# Altium PCB VCA.PcbDoc
Units mil, origin at the board's own origin, x right, y up, seen from the top; angles counter-clockwise.
Board outline 1102.36 x 3937.01 mil, 2 copper layers (Top Layer, Bottom Layer); 75 components, 53 nets, 251 pads, 58 vias.
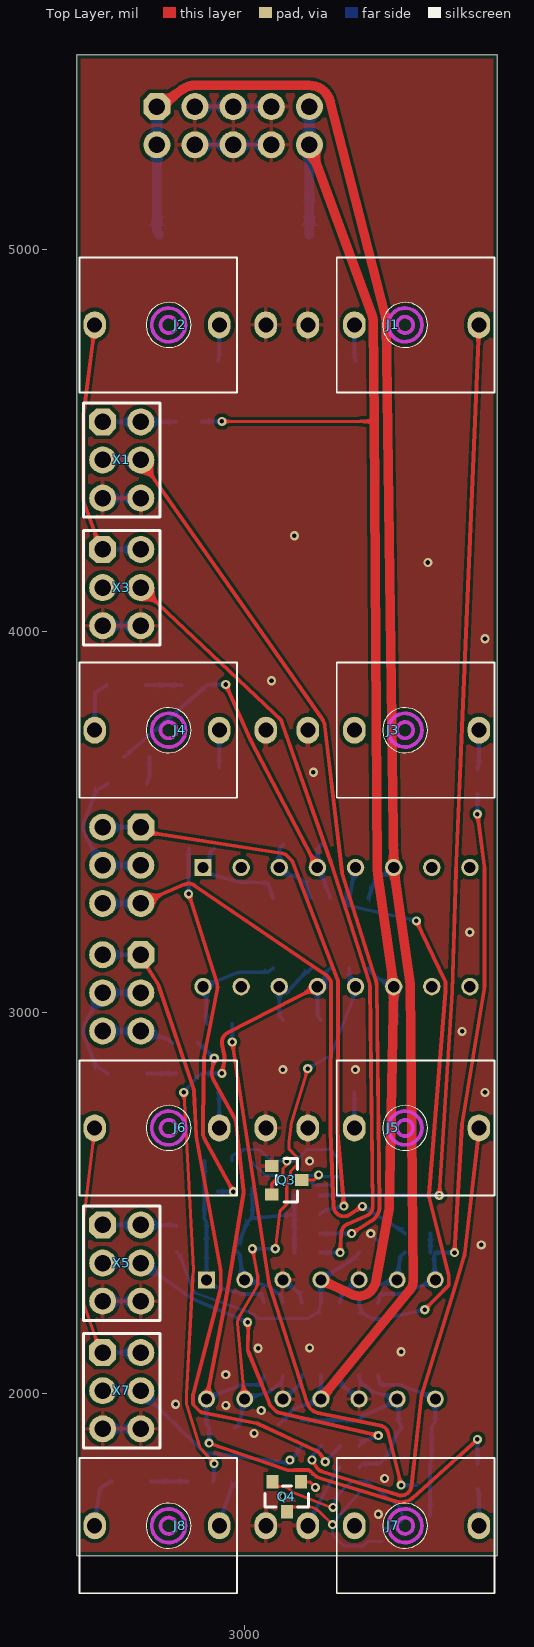
[diagram p0: Top Layer view]
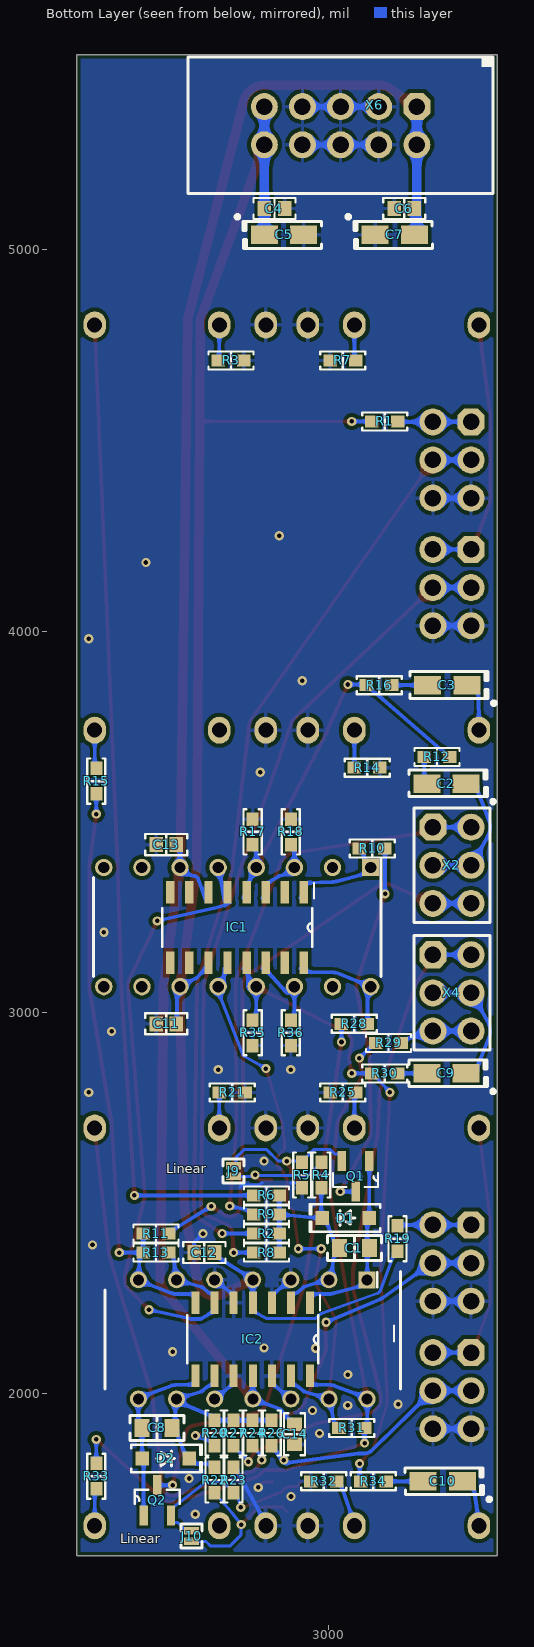
[diagram p1: Bottom Layer view, seen from below]
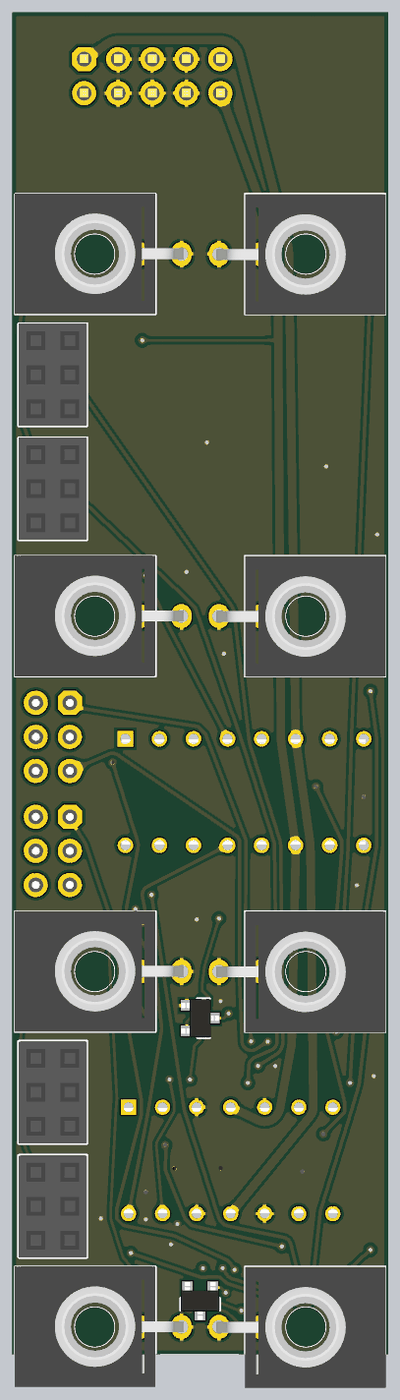
[diagram p2: 3D render of the assembled board from above, using the file's embedded part models]
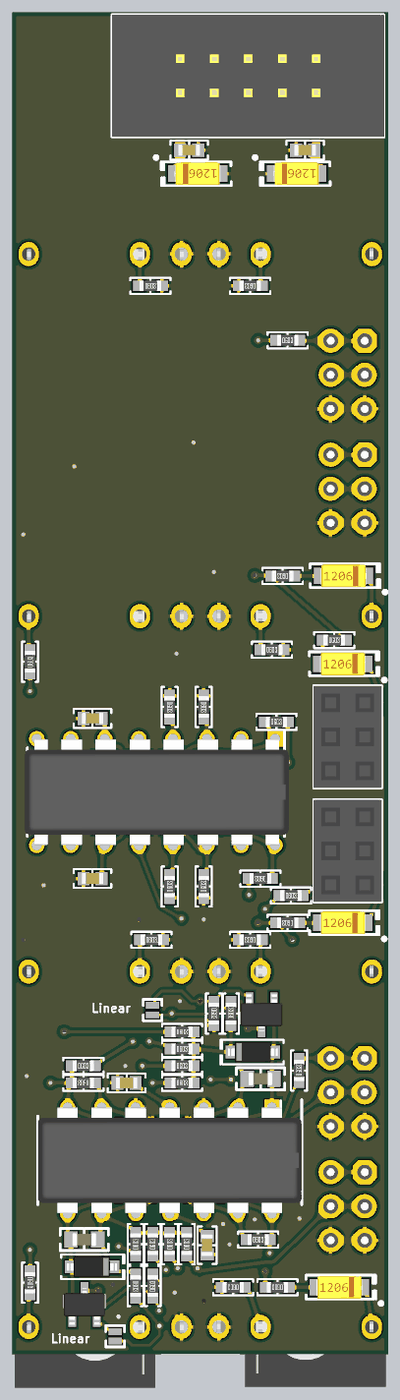
[diagram p3: 3D render of the assembled board from below, using the file's embedded part models]

## Layer stack, top to bottom
Top Solder: solder mask 0.4, Solder Resist, Dk 3.5
Top Layer: signal copper 1.4
Dielectric 1: dielectric 12.6, FR-4, Dk 4.8
Bottom Layer: signal copper 1.4
Bottom Solder: solder mask 0.4, Solder Resist, Dk 3.5

## Board outline
2559.06,1574.8 3661.42,1574.8 3661.42,5511.81 2559.06,5511.81

## Design rules (kind name [scope] priority, off if disabled: settings)
BoardOutlineClearance [All] p1: gap=10 ignorepadtopadclearanceinfootprint=FALSE except(0: Arc-SplitContinuation Track-SplitContinuation SMDPad-SplitContinuation THPad-SplitContinuation Via-SplitContinuation Fill-SplitContinuation Poly-SplitContinuation Region-SplitContinuation Text-SplitContinuation)
Clearance [All] p1: gap=10 ignorepadtopadclearanceinfootprint=FALSE except(8: Arc-Arc Arc-Track Arc-SMDPad Arc-Fill Arc-Poly Arc-Region Track-Track Track-SMDPad Track-Fill Track-Poly Track-Region SMDPad-SMDPad SMDPad-Fill SMDPad-Poly SMDPad-Region)
PolygonConnect [All] p1: thpad.connectstyle=Relief thpad.reliefconductorwidth=10 thpad.reliefentries=4 thpad.polygonreliefangle="90 Angle" thpad.airgapwidth=10 smdpad.connectstyle=Relief smdpad.reliefconductorwidth=10 smdpad.reliefentries=4 smdpad.polygonreliefangle="90 Angle" smdpad.airgapwidth=10 via.connectstyle=Direct via.reliefconductorwidth=10 via.reliefentries=4 via.polygonreliefangle="90 Angle" via.airgapwidth=10
RoutingVias [All] p1: holewidth=12 width=24 viastyle="Through Hole" minholewidth=12 minwidth=24 maxholewidth=12 maxwidth=24
SolderMaskExpansion [All] p1: expansion=4 istentingtop=FALSE
Width [All] p1: maxlimit=25 minlimit=8 preferedwidth=8
30 further rules are at their usual default settings.

## Components (designator, comment, footprint, x,y, rotation, side; value= is the part's Value field where it differs from the comment)
C1 "10000 pF" "MURATA GRM188 0603_1608" 2933.07,2381.89 r0 bottom
C2 "10µF" "CAP POL 1206_3216" 2691.57,3600 r0 bottom
C3 "10µF" "CAP POL 1206_3216" 2689.37,3858.27 r0 bottom
C4 "0.1 µF" "CAP 0603_1608" 3142.72,5108.27 r0 bottom
C5 "10µF" "CAP POL 1206_3216" 3117.72,5039.37 r180 bottom
C6 "0.1 µF" "CAP 0603_1608" 2802.17,5108.27 r0 bottom
C7 "10µF" "CAP POL 1206_3216" 2827.17,5039.37 r180 bottom
C8 "10000 pF" "MURATA GRM188 0603_1608" 3450.63,1910 r180 bottom
C9 "10µF" "CAP POL 1206_3216" 2691.57,2840 r0 bottom
C10 "10µF" "CAP POL 1206_3216" 2701.57,1770 r0 bottom
C11 "0.1 µF" "CAP 0603_1608" 3426.57,2970 r180 bottom
C12 "0.1 µF" "CAP 0603_1608" 3326.57,2370 r180 bottom
C13 "0.1 µF" "CAP 0603_1608" 3426.57,3440 r0 bottom
C14 "0.1 µF" "CAP 0603_1608" 3090,1893.43 r270 bottom
D1 "1N4148W-TP" SOD-123 2955.71,2460.63 r0 bottom
D2 "1N4148W-TP" SOD-123 3427.99,1830 r180 bottom
IC1 "LM13700N_NOPB" DIP_SMD-16 3240.42,3223.79 r270 bottom
IC2 "TL074CN" DIP_SMD-14 3199.61,2142.35 r270 bottom
J1 "ENV_IN" THONKICONN 3165.35,4803.15 r270 top
J2 "CV_IN" THONKICONN 3055.12,4803.15 r90 top
J3 "OUT1" THONKICONN 3165.35,3740.16 r270 top
J4 "IN1" THONKICONN 3055.12,3740.16 r90 top
J5 "ENV_IN" THONKICONN 3165.35,2696.85 r270 top
J6 "CV_IN" THONKICONN 3055.12,2696.85 r90 top
J7 "OUT2" THONKICONN 3165.35,1653.54 r270 top
J8 "IN2" THONKICONN 3055.12,1653.54 r90 top
J9 "Linear" "CON: JUMPER x1" 3250,2570 r90 bottom
J10 "Linear" "CON: JUMPER x1" 3360,1612.44 r90 bottom
Q1 "3906" SOT-23 2930,2570 r270 bottom
Q2 "3906" SOT-23 3450,1720 r90 bottom
Q3 "MMBT3904-7-F" "DIODES SOT-23-3" 3110,2560 r0 top
Q4 "MMBT3904-7-F" "DIODES SOT-23-3" 3110,1730 r270 top
R1 "120 kOhms" "YAGEO RES 0603_1608" 2853.46,4550 r180 bottom
R2 "330 kOhms" "YAGEO RES 0603_1608" 3163.46,2420 r180 bottom
R3 "100 kOhms" "YAGEO RES 0603_1608" 3256.54,4710 r180 bottom
R4 "33 kOhms" "YAGEO RES 0603_1608" 3020,2573.47 r90 bottom
R5 "1 kOhms" "YAGEO RES 0603_1608" 3070,2573.46 r270 bottom
R6 "330 kOhms" "YAGEO RES 0603_1608" 3163.46,2520 r180 bottom
R7 "100 kOhms" "YAGEO RES 0603_1608" 2963.46,4710 r0 bottom
R8 "330 kOhms" "YAGEO RES 0603_1608" 3163.46,2370 r180 bottom
R9 "330 kOhms" "YAGEO RES 0603_1608" 3163.46,2470 r180 bottom
R10 "6.8 kOhms" "YAGEO RES 0603_1608" 2886.54,3430 r180 bottom
R11 "1 kOhms" "YAGEO RES 0603_1608" 3453.46,2420 r180 bottom
R12 "100 kOhms" "YAGEO RES 0603_1608" 2716.54,3670 r180 bottom
R13 "18 kOhms" "YAGEO RES 0603_1608" 3453.46,2370 r0 bottom
R14 "100 kOhms" "YAGEO RES 0603_1608" 2899.61,3641.73 r180 bottom
R15 "1 kOhms" "YAGEO RES 0603_1608" 3610,3606.54 r90 bottom
R16 "100 kOhms" "YAGEO RES 0603_1608" 2868.11,3858.27 r0 bottom
R17 "620 Ohms" "YAGEO RES 0603_1608" 3200,3473.46 r270 bottom
R18 "620 Ohms" "YAGEO RES 0603_1608" 3100,3473.46 r270 bottom
R19 "120 kOhms" "YAGEO RES 0603_1608" 2820,2406.54 r90 bottom
R20 "330 kOhms" "YAGEO RES 0603_1608" 3300,1896.54 r90 bottom
R21 "100 kOhms" "YAGEO RES 0603_1608" 3253.46,2790 r180 bottom
R22 "33 kOhms" "YAGEO RES 0603_1608" 3300,1773.46 r270 bottom
R23 "1 kOhms" "YAGEO RES 0603_1608" 3250,1773.46 r90 bottom
R24 "330 kOhms" "YAGEO RES 0603_1608" 3200,1896.54 r90 bottom
R25 "100 kOhms" "YAGEO RES 0603_1608" 2963.46,2790 r0 bottom
R26 "330 kOhms" "YAGEO RES 0603_1608" 3150,1896.54 r90 bottom
R27 "330 kOhms" "YAGEO RES 0603_1608" 3250,1896.54 r90 bottom
R28 "6.8 kOhms" "YAGEO RES 0603_1608" 2933.46,2970 r0 bottom
R29 "1 kOhms" "YAGEO RES 0603_1608" 2843.46,2920 r180 bottom
R30 "100 kOhms" "YAGEO RES 0603_1608" 2853.46,2840 r0 bottom
R31 "18 kOhms" "YAGEO RES 0603_1608" 2940,1910 r180 bottom
R32 "100 kOhms" "YAGEO RES 0603_1608" 3013.46,1770 r0 bottom
R33 "1 kOhms" "YAGEO RES 0603_1608" 3610,1783.46 r270 bottom
R34 "100 kOhms" "YAGEO RES 0603_1608" 2883.46,1770 r0 bottom
R35 "620 Ohms" "YAGEO RES 0603_1608" 3200,2946.54 r90 bottom
R36 "620 Ohms" "YAGEO RES 0603_1608" 3100,2946.54 r90 bottom
X1 "Connector, 6pin, 2.54mm, 500VAC, 3A" "CON: PBD-6" 2677.17,4448.82 r270 top
X2 "Connector, 6pin, 2.54mm, 500VAC, 3A" "CON: PBD-6" 2677.17,3385.83 r270 bottom
X3 "Connector, 6pin, 2.54mm, 500VAC, 3A" "CON: PBD-6" 2677.17,4114.17 r270 top
X4 "Connector, 6pin, 2.54mm, 500VAC, 3A" "CON: PBD-6" 2677.17,3051.18 r270 bottom
X5 "Connector, 6pin, 2.54mm, 500VAC, 3A" "CON: PBD-6" 2677.17,2342.52 r270 top
X6 "Connector, 10pin, 2.54mm, 250VAC, 3A" "CON: IDC-10MS" 2969.29,5325.59 r0 bottom
X7 "Connector, 6pin, 2.54mm, 500VAC, 3A" "CON: PBD-6" 2677.17,2007.87 r270 top

## Footprints (in the part's own frame and the unit in brackets; to place one, negate y for a bottom-side part, rotate by r counter-clockwise, add the part's x,y. Pads: shape width x height; smd on the part's side, far side on the other; paste and mask are expansions set on the pad)
"CAP 0603_1608" [mm] "Chip Capacitor, 2-Leads, Body 1.60x0.80mm, IPC Medium Density"
  rect 0.9x1 smd: 1(-0.675,0) 2(0.675,0)
  silkscreen extent -1.4,-0.7 1.4,0.7, body extent -0.8,-0.41 0.8,0.41, height 0.82
"CAP POL 1206_3216" [mm] "Molded Capacitor, 2-Leads, Body 3.20x1.6mm, IPC Medium Density"
  rect 1.8x1.23 smd: 1(-1.31,0) 2(1.31,0)
  silkscreen extent -3.22,-0.9 2.5,1.32, body extent -1.72,-0.85 1.71,0.85, height 1.7
"CON: IDC-10MS" [mm] "IDC-10MS 10 pin PCB-mount header"
  oct 1.8x1.8 hole 1.1: 1(-5.08,-1.27)
  round 1.8 hole 1.1: 2(-5.08,1.27) 3(-2.54,-1.27) 4(-2.54,1.27) 5(0,-1.27) 6(0,1.27) 7(2.54,-1.27) 8(2.54,1.27) 9(5.08,-1.27) 10(5.08,1.27)
  round 0.5 on Mech1: ""(-9.6,-4)
  silkscreen extent -10.14,-4.57 10.16,4.53, body extent -10.14,-4.57 10.16,4.53, height 9
"CON: JUMPER x1" [mm]
  rect 0.5x1 smd: 1(0,0) 2(0.7,0)
  silkscreen extent -0.45,-0.7 1.15,0.7
"CON: PBD-6" [mm] "PBD-6"
  oct 1.8x1.8 hole 1.1: 1(-2.54,-1.27)
  round 1.8 hole 1.1: 2(-2.54,1.27) 3(0,-1.27) 4(0,1.27) 5(2.54,-1.27) 6(2.54,1.27)
  silkscreen extent -3.81,-2.54 3.81,2.54, body extent -3.81,-2.54 3.81,2.54, height 8.5
"DIODES SOT-23-3" [mm] "SOT23, 3-Leads, Body 2.90x2.40mm, Pitch 0.95mm, IPC Medium Density"
  rect 0.9x0.8 smd: 1(-1,0.95) 2(-1,-0.95) 3(1,0)
  silkscreen extent -0.7,-1.45 0.7,1.45, body extent -1.41,-1.45 1.41,1.45, height 1.5
DIP_SMD-14 [mm] "Combo footprint for opamps that i have"
  rect 1.13x1.13 hole 0.73: 1(-3.97,7.62)
  rect 1.5x0.533 smd: 1(-2.441,3.81) 2(-2.441,2.54) 3(-2.441,1.27) 4(-2.441,0) 5(-2.441,-1.27) 6(-2.441,-2.54) 7(-2.441,-3.81) 8(2.416,-3.81) 9(2.416,-2.54) 10(2.416,-1.27) 11(2.416,0) 12(2.416,1.27) 13(2.416,2.54) 14(2.416,3.81)
  round 1.13 hole 0.73: 2(-3.97,5.08) 3(-3.97,2.54) 4(-3.97,0) 5(-3.97,-2.54) 6(-3.97,-5.08) 7(-3.97,-7.62) 8(3.97,-7.62) 9(3.97,-5.08) 10(3.97,-2.54) 11(3.97,0) 12(3.97,2.54) 13(3.97,5.08) 14(3.97,7.62)
  silkscreen extent -4.53,-9.84 3.3,9.84, body extent -3.94,-9.84 3.94,9.84, height 5.27
DIP_SMD-16 [mm] "Combo footprint for opamps that i have"
  rect 1.159x1.159 hole 0.759: 1(-3.969,8.89)
  rect 1.5x0.559 smd: 1(-2.325,4.435) 2(-2.325,3.165) 3(-2.325,1.895) 4(-2.325,0.625) 5(-2.325,-0.645) 6(-2.325,-1.915) 7(-2.325,-3.185) 8(-2.325,-4.455) 9(2.375,-4.455) 10(2.375,-3.185) 11(2.375,-1.915) 12(2.375,-0.645) 13(2.375,0.625) 14(2.375,1.895) 15(2.375,3.165) 16(2.375,4.435)
  round 1.159 hole 0.759: 2(-3.969,6.35) 3(-3.969,3.81) 4(-3.969,1.27) 5(-3.969,-1.27) 6(-3.969,-3.81) 7(-3.969,-6.35) 8(-3.969,-8.89) 9(3.969,-8.89) 10(3.969,-6.35) 11(3.969,-3.81) 12(3.969,-1.27) 13(3.969,1.27) 14(3.969,3.81) 15(3.969,6.35) 16(3.969,8.89)
  silkscreen extent -4.55,-9.59 3.3,9.59, body extent -3.94,-9.78 3.94,9.91, height 5.27
"MURATA GRM188 0603_1608" [mm] "Chip Capacitor, 2-Leads, Body 1.60x0.80mm"
  rect 1x1.2 smd: 1(-1,0) 2(1,0)
  silkscreen extent -1.8,-0.83 1.8,0.83, body extent -0.9,-0.5 0.9,0.5, height 1
SOD-123 [mm] "SOD, 2-Leads, Body 1.55x3.70mm, IPC Medium Density"
  rect 0.9x0.95 smd: 1(-1.575,0) 2(1.575,0)
  silkscreen extent -2.3,-0.92 2.41,0.92, body extent -1.86,-0.78 1.86,0.77, height 1.35
SOT-23 [mil]
  rect 52x22 smd: 1(-40,36) 2(-40,-36) 3(40,0)
  silkscreen extent -9,-59 28,59, body extent -60,-61 58,61, height 57
THONKICONN [mm]
  oval 1.8x1.5 hole 1: 1(0,0) 2(0,3.1) 3(0,11.4)
  silkscreen extent -4.5,1.93 4.5,12.42, body extent -4.47,-0.18 4.53,12.45, height 14.5
"YAGEO RES 0603_1608" [mm] "Chip Resistor, 2-Leads, Body 1.60x0.80mm"
  rect 0.9x0.8 smd: 1(-0.85,0) 2(0.85,0)
  silkscreen extent -1.5,-0.6 1.5,0.6, body extent -0.8,-0.4 0.8,0.4, height 0.45

## Part data
C1 C8: library part GRM1885C1H103JA01D, "CAP CER 10000PF 50V C0G/NP0 0603", Device Package="0603 (1608 Metric)", Manufacturer="Murata Electronics", Operating Temperature="-55°C ~ 125°C", Supplier Part Number 1=490-9666-1-ND, Temperature Coefficient="C0G, NP0", Tolerance=±5%, Voltage - Rated=50V, Applications="General Purpose", Capacitance="10000 pF", ComponentLink1Description=Datasheet, ComponentLink1URL=https://www.murata.com/~/media/webrenewal/support/library/catalog/products/capacitor/mlcc/c02e.ashx?la=en-us, ComponentLink2Description="DigiKey Link", ComponentLink2URL=https://www.digikey.com/en/products/detail/murata-electronics/GRM1885C1H103JA01D/4421555, LastUpdated="7/20/2024 12:23:21 AM", Lifecycle Status=Active, Minimum Order=1, Mounting Type="Surface Mount, MLCC", Package / Case="0603 (1608 Metric)", Packaging=TapeAndReel, Part Number=GRM1885C1H103JA01D, Part Status=Active, PartId=11077, Price=0.02, Series=GRM, Size / Dimension="0.063\" L x 0.031\" W (1.60mm x 0.80mm)", Supplier 1=DigiKey, Thickness (Max)="0.035\" (0.90mm)"
C2 C3 C5 C7 C9 C10: library part T491A106K010AT, "CAP TANT 10UF 10% 10V 1206", Device Package="1206 (3216 Metric)", ESR (Equivalent Series Resistance)=3.8Ohm, Lifetime @ Temp.="2000 Hrs @ 125°C", Manufacturer=KEMET, Manufacturer Size Code=A, Operating Temperature="-55°C ~ 125°C", Supplier Part Number 1=399-3684-1-ND, Tolerance=±10%, Voltage - Rated=10V, Capacitance=10µF, ComponentLink1Description=Datasheet, ComponentLink1URL=https://api.kemet.com/component-edge/download/datasheet/T491A106K010AT.pdf, ComponentLink2Description="DigiKey Link", ComponentLink2URL=http://digikey.com/product-detail/en/kemet/T491A106K010AT/399-3684-1-ND/819009, Features="General Purpose", Height - Seated (Max)="0.071\" (1.80mm)", LastUpdated="9/2/2020 1:15:58 AM", Lifecycle Status=Active, Minimum Order=1, Mounting Type="Surface Mount", Package / Case="1206 (3216 Metric)", Packaging=TapeAndReel, Part Number=T491A106K010AT, Part Status=Active, PartId=330, Price=0.07, Series=T491, Size / Dimension="0.126\" L x 0.063\" W (3.20mm x 1.60mm)", Supplier 1=DigiKey, Type=Molded
C4 C6 C11 C12 C13 C14: library part C0603C104K5RAC7411, "CAP CER 0.1UF 50V X7R 0603", Device Package="0603 (1608 Metric)", Manufacturer=KEMET, Operating Temperature="-55°C ~ 125°C", Supplier Part Number 1=399-C0603C104K5RAC7411CT-ND, Temperature Coefficient=X7R, Tolerance=±10%, Voltage - Rated=50V, Applications="Bypass, Decoupling", Capacitance="0.1 µF", ComponentLink1Description=Datasheet, ComponentLink1URL=https://api.kemet.com/component-edge/download/datasheet/C0603C104K5RAC7411.pdf, ComponentLink2Description="DigiKey Link", ComponentLink2URL=https://www.digikey.com/en/products/detail/kemet/C0603C104K5RAC7411/3317013, LastUpdated="2/9/2024 8:10:30 PM", Lifecycle Status=Active, Minimum Order=1, Mounting Type="Surface Mount, MLCC", Package / Case="0603 (1608 Metric)", Packaging=TapeAndReel, Part Number=C0603C104K5RAC7411, Part Status=Active, PartId=2233, Price=0.01, Series="SMD Comm X7R", Size / Dimension="0.063\" L x 0.031\" W (1.60mm x 0.80mm)", Supplier 1=DigiKey, Thickness (Max)="0.035\" (0.90mm)"
D1 D2: "DIODE GEN PURP 100V 150MA SOD123", Capacitance @ Vr, F="2pF @ 0V, 1MHz", Current - Average Rectified (Io)=150mA, Current - Reverse Leakage @ Vr="1 µA @ 75 V", Manufacturer="Micro Commercial Co", Operating Temperature - Junction="-65°C ~ 150°C", Package / Case=SOD-123, Supplier Part Number 1=1N4148WTPMSCT-ND, Voltage - DC Reverse (Vr) (Max)="100 V", Voltage - Forward (Vf) (Max) @ If="1.25 V @ 150 mA", ComponentLink1Description=Datasheet, ComponentLink1URL=https://www.mccsemi.com/pdf/Products/1N4148W(SOD123).pdf, ComponentLink2Description="DigiKey Link", ComponentLink2URL=https://www.digikey.com/en/products/detail/micro-commercial-co/1N4148W-TP/717196, Diode Type=Standard, LastUpdated="6/3/2024 7:54:46 PM", Lifecycle Status=Active, Minimum Order=1, Mounting Type="Surface Mount", Packaging=TapeAndReel, Part Number=1N4148W-TP, Part Status=Active, PartId=999, Price=0.01, Reverse Recovery Time (trr)="4 ns", Series=-, Speed="Small Signal =< 200mA (Io), Any Speed", Supplier 1=DigiKey, Supplier Device Package=SOD-123
IC1: "Integrated Circuit", Arrow Part Number=LM13700N/NOPB, Manufacturer_Name="Texas Instruments", Mouser Part Number=926-LM13700N/NOPB, Arrow Price/Stock=https://www.arrow.com/en/products/lm13700nnopb/texas-instruments?region=nac, Datasheet Link=http://www.ti.com/lit/ds/symlink/lm13700.pdf, Height=4.318mm, Manufacturer_Part_Number=LM13700N/NOPB, Mouser Price/Stock=https://www.mouser.co.uk/ProductDetail/Texas-Instruments/LM13700N-NOPB?qs=X1J7HmVL2ZFKw9D7azZDXw%3D%3D
IC2: "Integrated Circuit", Manufacturer_Name="Texas Instruments", Mouser Part Number=595-TL074CN, Arrow Part Number=TL074CN, Arrow Price/Stock=https://www.arrow.com/en/products/tl074cn/texas-instruments?utm_currency=USD&region=nac, Datasheet Link=https://www.ti.com/lit/ds/symlink/tl074.pdf?HQS=TI-null-null-mousermode-df-pf-null-wwe&ts=1598513500878&ref_url=https%253A%252F%252Feu.mouser.com%252F, Height=5.08mm, Manufacturer_Part_Number=TL074CN, Mouser Price/Stock=https://www.mouser.co.uk/ProductDetail/Texas-Instruments/TL074CN?qs=AMJt07B76uv7dLYnj7iLiQ%3D%3D
J1 J2 J3 J4 J5 J6 J7 J8: library part PJ-301M-3P, "THONKICONN metal"
J9 J10: library part Jumper_single, CommentText="\"Перемычка\""
Q1 Q2: library part MMBT3906
Q3 Q4: "TRANS NPN 40V 0.2A SOT23-3", Current - Collector (Ic) (Max)="200 mA", Current - Collector Cutoff (Max)="50nA (ICBO)", DC Current Gain (hFE) (Min) @ Ic, Vce="100 @ 10mA, 1V", Frequency - Transition=300MHz, Manufacturer="Diodes Incorporated", Operating Temperature="-55°C ~ 150°C (TJ)", Package / Case="TO-236-3, SC-59, SOT-23-3", Power - Max="300 mW", Supplier Device Package=SOT-23-3, Supplier Part Number 1=MMBT3904-FDICT-ND, Voltage - Collector Emitter Breakdown (Max)="40 V", ComponentLink1Description=Datasheet, ComponentLink1URL=https://www.diodes.com/assets/Datasheets/ds30036.pdf, ComponentLink2Description="DigiKey Link", ComponentLink2URL=https://www.digikey.com/en/products/detail/diodes-incorporated/MMBT3904-7-F/814494, LastUpdated="2/8/2024 9:54:04 PM", Lifecycle Status=Active, Minimum Order=1, Mounting Type="Surface Mount", Packaging=TapeAndReel, Part Number=MMBT3904-7-F, Part Status=Active, PartId=85, Price=0.01, Series=-, Supplier 1=DigiKey, Transistor Type=NPN, Vce Saturation (Max) @ Ib, Ic="300mV @ 5mA, 50mA"
R1 R19: library part AC0603FR-07120KL, "RES SMD 120K OHM 1% 1/10W 0603", Device Package="0603 (1608 Metric)", Manufacturer=Yageo, Operating Temperature="-55°C ~ 155°C", Power (Watts)="0.1W, 1/10W", Ratings=AEC-Q200, Supplier Device Package=0603, Supplier Part Number 1=YAG3562CT-ND, Temperature Coefficient=±100ppm/°C, Tolerance=±1%, ComponentLink1Description=Datasheet, ComponentLink1URL=https://www.yageo.com/upload/media/product/productsearch/datasheet/rchip/PYu-AC_51_RoHS_L_7.pdf, ComponentLink2Description="DigiKey Link", ComponentLink2URL=https://www.digikey.com/en/products/detail/yageo/AC0603FR-07120KL/5895760, Composition="Thick Film", Features="Automotive AEC-Q200, Moisture Resistant", Height - Seated (Max)="0.022\" (0.55mm)", LastUpdated="7/25/2024 9:19:23 AM", Lifecycle Status=Active, Minimum Order=1, Number of Terminations=2, Package / Case="0603 (1608 Metric)", Packaging=CutTape, Part Number=AC0603FR-07120KL, Part Status=Active, PartId=17461, Price=0.01, Resistance="120 kOhms", Series=AC, Size / Dimension="0.063\" L x 0.031\" W (1.60mm x 0.80mm)", Supplier 1=DigiKey
R2 R6 R8 R9 R20 R24 R26 R27: library part AC0603FR-07330KL, "RES SMD 330K OHM 1% 1/10W 0603", Device Package="0603 (1608 Metric)", Manufacturer=Yageo, Operating Temperature="-55°C ~ 155°C", Power (Watts)="0.1W, 1/10W", Ratings=AEC-Q200, Supplier Device Package=0603, Supplier Part Number 1=YAG3594CT-ND, Temperature Coefficient=±100ppm/°C, Tolerance=±1%, ComponentLink1Description=Datasheet, ComponentLink1URL=https://www.yageo.com/upload/media/product/productsearch/datasheet/rchip/PYu-AC_51_RoHS_L_7.pdf, ComponentLink2Description="DigiKey Link", ComponentLink2URL=https://www.digikey.com/en/products/detail/yageo/AC0603FR-07330KL/5896036, Composition="Thick Film", Features="Automotive AEC-Q200, Moisture Resistant", Height - Seated (Max)="0.022\" (0.55mm)", LastUpdated="7/25/2024 9:19:23 AM", Lifecycle Status=Active, Minimum Order=1, Number of Terminations=2, Package / Case="0603 (1608 Metric)", Packaging=CutTape, Part Number=AC0603FR-07330KL, Part Status=Active, PartId=17469, Price=0.01, Resistance="330 kOhms", Series=AC, Size / Dimension="0.063\" L x 0.031\" W (1.60mm x 0.80mm)", Supplier 1=DigiKey
R3 R7 R12 R14 R16 R21 R25 R30 R32 R34: library part AA0603FR-07100KL, "RES SMD 100K OHM 1% 1/10W 0603", Device Package="0603 (1608 Metric)", Manufacturer=Yageo, Operating Temperature="-55°C ~ 155°C", Power (Watts)="0.1W, 1/10W", Ratings=AEC-Q200, Supplier Device Package=0603, Supplier Part Number 1=13-AA0603FR-07100KLCT-ND, Temperature Coefficient=±150ppm/°C, Tolerance=±1%, ComponentLink1Description=Datasheet, ComponentLink1URL=https://www.yageo.com/upload/media/product/productsearch/datasheet/rchip/PYu-AA_51_RoHS_L_3.pdf, ComponentLink2Description="DigiKey Link", ComponentLink2URL=https://www.digikey.com/en/products/detail/yageo/AA0603FR-07100KL/5888687, Composition="Thick Film", Features="Anti-Sulfur, Automotive AEC-Q200, Moisture Resistant", Height - Seated (Max)="0.022\" (0.55mm)", LastUpdated="7/25/2024 9:19:03 AM", Lifecycle Status=Active, Minimum Order=1, Number of Terminations=2, Package / Case="0603 (1608 Metric)", Packaging=TapeAndReel, Part Number=AA0603FR-07100KL, PartId=78895, Price=0.01, Resistance="100 kOhms", Series=AA, Size / Dimension="0.063\" L x 0.031\" W (1.60mm x 0.80mm)", Supplier 1=DigiKey
R4 R22: library part AC0603FR-0733KL, "RES SMD 33K OHM 1% 1/10W 0603", Device Package="0603 (1608 Metric)", Manufacturer=Yageo, Operating Temperature="-55°C ~ 155°C", Power (Watts)="0.1W, 1/10W", Ratings=AEC-Q200, Supplier Device Package=0603, Supplier Part Number 1=YAG3598CT-ND, Temperature Coefficient=±100ppm/°C, Tolerance=±1%, ComponentLink1Description=Datasheet, ComponentLink1URL=https://www.yageo.com/upload/media/product/productsearch/datasheet/rchip/PYu-AC_51_RoHS_L_7.pdf, ComponentLink2Description="DigiKey Link", ComponentLink2URL=https://www.digikey.com/en/products/detail/yageo/AC0603FR-0733KL/5896041, Composition="Thick Film", Features="Automotive AEC-Q200, Moisture Resistant", Height - Seated (Max)="0.022\" (0.55mm)", LastUpdated="7/25/2024 9:19:23 AM", Lifecycle Status=Active, Minimum Order=1, Number of Terminations=2, Package / Case="0603 (1608 Metric)", Packaging=CutTape, Part Number=AC0603FR-0733KL, Part Status=Active, PartId=17385, Price=0.01, Resistance="33 kOhms", Series=AC, Size / Dimension="0.063\" L x 0.031\" W (1.60mm x 0.80mm)", Supplier 1=DigiKey
R5 R11 R15 R23 R29 R33: library part AA0603FR-071KL, "RES SMD 1K OHM 1% 1/10W 0603", Device Package="0603 (1608 Metric)", Manufacturer=Yageo, Operating Temperature="-55°C ~ 155°C", Power (Watts)="0.1W, 1/10W", Ratings=AEC-Q200, Supplier Device Package=0603, Supplier Part Number 1=13-AA0603FR-071KLCT-ND, Temperature Coefficient=±150ppm/°C, Tolerance=±1%, ComponentLink1Description=Datasheet, ComponentLink1URL=https://www.yageo.com/upload/media/product/productsearch/datasheet/rchip/PYu-AA_51_RoHS_L_3.pdf, ComponentLink2Description="DigiKey Link", ComponentLink2URL=https://www.digikey.com/en/products/detail/yageo/AA0603FR-071KL/5888847, Composition="Thick Film", Features="Anti-Sulfur, Automotive AEC-Q200, Moisture Resistant", Height - Seated (Max)="0.022\" (0.55mm)", LastUpdated="7/25/2024 9:19:15 AM", Lifecycle Status=Active, Minimum Order=1, Number of Terminations=2, Package / Case="0603 (1608 Metric)", Packaging=TapeAndReel, Part Number=AA0603FR-071KL, Part Status=Active, PartId=64335, Price=0.01, Resistance="1 kOhms", Series=AA, Size / Dimension="0.063\" L x 0.031\" W (1.60mm x 0.80mm)", Supplier 1=DigiKey
R10 R28: library part AC0603FR-076K8L, "RES SMD 6.8K OHM 1% 1/10W 0603", Device Package="0603 (1608 Metric)", Manufacturer=Yageo, Operating Temperature="-55°C ~ 155°C", Power (Watts)="0.1W, 1/10W", Ratings=AEC-Q200, Supplier Device Package=0603, Supplier Part Number 1=YAG3627CT-ND, Temperature Coefficient=±100ppm/°C, Tolerance=±1%, ComponentLink1Description=Datasheet, ComponentLink1URL=https://www.yageo.com/upload/media/product/productsearch/datasheet/rchip/PYu-AC_51_RoHS_L_7.pdf, ComponentLink2Description="DigiKey Link", ComponentLink2URL=https://www.digikey.com/en/products/detail/yageo/AC0603FR-076K8L/5896266, Composition="Thick Film", Features="Automotive AEC-Q200, Moisture Resistant", Height - Seated (Max)="0.022\" (0.55mm)", LastUpdated="7/25/2024 9:19:23 AM", Lifecycle Status=Active, Minimum Order=1, Number of Terminations=2, Package / Case="0603 (1608 Metric)", Packaging=CutTape, Part Number=AC0603FR-076K8L, Part Status=Active, PartId=17383, Price=0.01, Resistance="6.8 kOhms", Series=AC, Size / Dimension="0.063\" L x 0.031\" W (1.60mm x 0.80mm)", Supplier 1=DigiKey
R13 R31: library part AC0603FR-0718KL, "RES SMD 18K OHM 1% 1/10W 0603", Device Package="0603 (1608 Metric)", Manufacturer=Yageo, Operating Temperature="-55°C ~ 155°C", Power (Watts)="0.1W, 1/10W", Ratings=AEC-Q200, Supplier Device Package=0603, Supplier Part Number 1=YAG3570CT-ND, Temperature Coefficient=±100ppm/°C, Tolerance=±1%, ComponentLink1Description=Datasheet, ComponentLink1URL=https://www.yageo.com/upload/media/product/productsearch/datasheet/rchip/PYu-AC_51_RoHS_L_7.pdf, ComponentLink2Description="DigiKey Link", ComponentLink2URL=https://www.digikey.com/en/products/detail/yageo/AC0603FR-0718KL/5895836, Composition="Thick Film", Features="Automotive AEC-Q200, Moisture Resistant", Height - Seated (Max)="0.022\" (0.55mm)", LastUpdated="7/25/2024 9:19:23 AM", Lifecycle Status=Active, Minimum Order=1, Number of Terminations=2, Package / Case="0603 (1608 Metric)", Packaging=CutTape, Part Number=AC0603FR-0718KL, Part Status=Active, PartId=17436, Price=0.01, Resistance="18 kOhms", Series=AC, Size / Dimension="0.063\" L x 0.031\" W (1.60mm x 0.80mm)", Supplier 1=DigiKey
R17 R18 R35 R36: library part AC0603FR-07620RL, "RES SMD 620 OHM 1% 1/10W 0603", Device Package="0603 (1608 Metric)", Manufacturer=Yageo, Operating Temperature="-55°C ~ 155°C", Power (Watts)="0.1W, 1/10W", Ratings=AEC-Q200, Supplier Device Package=0603, Supplier Part Number 1=13-AC0603FR-07620RLCT-ND, Temperature Coefficient=±100ppm/°C, Tolerance=±1%, ComponentLink1Description=Datasheet, ComponentLink1URL=https://www.yageo.com/upload/media/product/productsearch/datasheet/rchip/PYu-AC_51_RoHS_L_8.pdf, ComponentLink2Description="DigiKey Link", ComponentLink2URL=https://www.digikey.com/en/products/detail/yageo/AC0603FR-07620RL/5896232, Composition="Thick Film", Features="Automotive AEC-Q200, Moisture Resistant", Height - Seated (Max)="0.022\" (0.55mm)", LastUpdated="7/25/2024 9:19:12 AM", Lifecycle Status=Active, Minimum Order=1, Number of Terminations=2, Package / Case="0603 (1608 Metric)", Packaging=CutTape, Part Number=AC0603FR-07620RL, Part Status=Active, PartId=62322, Price=0.01, Resistance="620 Ohms", Series=AC, Size / Dimension="0.063\" L x 0.031\" W (1.60mm x 0.80mm)", Supplier 1=DigiKey
X1 X2 X3 X4 X5 X7: library part PBD-6, CurrentMax=3A, Manufacturer=Connfly, VoltageMax=500VAC, CommentText="\"Разъем\"", helpurl=https://www.chipdip.ru/product/pbd-6, Multichannel=6pin, PartNumber=PBD-6, Pitch=2.54mm, TypeConnector=Connector, ValueManufacturerPartNumber="Connector, 6pin, 2.54mm, 500VAC, 3A"
X6: library part IDC-10, CurrentMax=3A, Manufacturer=Connfly, VoltageMax=250VAC, CommentText="\"Разъем\"", helpurl=https://www.chipdip.ru/product/idc-10ms, Multichannel=10pin, PartNumber=IDC-10, Pitch=2.54mm, TypeConnector=Connector, ValueManufacturerPartNumber="Connector, 10pin, 2.54mm, 250VAC, 3A"

## Via types
v1: diameter 24, hole 12, Top Layer to Bottom Layer, tented both sides, 58 vias

## Nets (pads, with @x,y where several pads share a name; then routed paths per layer and width w, separated by ;. In a path a pad name is that pad's centre, name@x,y a point inside that pad or via, vN(x,y) a via of type N, cw(c..) or ccw(c..) an arc to the next point about the centre after c; other vN are vias at no path point)
+12: C4.2 C5.1 C11.2 C12.2 IC1.11 IC2.4 R1.1 R19.1 X6.9 X6.10 | length 4833.6
  Top Layer w8: v1(2940,4550) 3339.18,4550
  Top Layer w25: X6.10 3334.36,4826.31 cw(c3287.4,4809.06) 3337.43,4809.39 3339.18,4549.99 3347.11,3379.76 ccw(c3390.42,3380.05) 3347.35,3375.5 3348.74,3362.26 3390.13,3069.2 ccw(c3414.88,3072.69) IC1.11@3390.42,3067.53 ; IC2.4@3199.61,2298.65 3281.34,2260.01 ccw(c3299.61,2298.65) 3337.78,2279.41 3343.73,2291.23 3377.74,2478.6 ccw(c3308.38,2491.19) 3378.86,2489.7 3390.98,3061.72 ccw(c3365.98,3062.25) IC1.11@3390.43,3067.5
  Bottom Layer w8: R19.1 2831.75,2359.35 2864.23,2271.55 ccw(c2877.36,2276.41) 2872.63,2263.23 3015.99,2211.7 cw(c3007.19,2187.23) 3025.84,2205.36 3030.5,2200.56 ccw(c3039.11,2208.92) 3039.11,2196.92 3160.11,2196.92 ccw(c3160.11,2208.92) 3165.75,2198.33 3193.11,2212.92 IC2.4@3199.61,2238.45
  Bottom Layer w10: R1.1 v1(2940,4550) ; IC2.4@3199.61,2238.45 3199.61,2298.65 3202.54,2301.58 cw(c3209.61,2294.51) 3204.24,2302.95 3287.28,2355.32 C12.2 ; IC1.11@3324.06,3115.16 3345.22,3091.99 ccw(c3354.82,3100.76) 3348.81,3089.23 3390.42,3067.53 3398.66,3050.43 3398.66,2984.69 C11.2
  Bottom Layer w25: C5.1 3169.29,5051.08 X6.9
-12: C6.1 C7.2 C13.1 C14.1 IC1.6 IC2.11 X6.1 X6.2 | length 4742.9
  Top Layer w25: X6.1 2792.22,5388.13 2836.01,5420.55 cw(c2869.29,5375.59) 2869.29,5431.52 3169.29,5431.52 cw(c3169.29,5375.59) 3223.45,5389.56 3367.8,4829.79 cw(c3287.4,4809.06) 3370.42,4810.22 3390.42,3380.4 cw(c3365.42,3380.05) 3390.42,3380.05 ccw(c3415.42,3380.05) 3390.67,3376.56 3433.31,3073.57 cw(c3390.42,3067.53) 3433.73,3068.01 3442.35,2299.13 cw(c3399.61,2298.65) 3432.72,2271.62 IC2.11@3199.61,1986.06
  Bottom Layer w10: C14.1 3104.69,1932.72 3124.3,1956.08 cw(c3134.25,1947.72) 3129.7,1959.89 3199.61,1986.06 IC2.11@3199.61,2047.24 ; IC1.6@3324.06,3300.2 3342.65,3349.45 cw(c3354.82,3344.85) 3352.4,3357.63 3384.6,3363.72 ccw(c3382.81,3373.56) 3391.55,3378.43 3400,3366.26 3390.42,3380.05 3390.42,3425.32 C13.1
  Bottom Layer w25: X6.1 2769.29,5352.66 X6.2 2769.29,5108.27 2769.29,5051.08 C7.2
CV_B1: C4.1 C5.2 C6.2 C7.1 C11.1 C12.1 C13.2 C14.2 IC2.3 IC2.5 IC2.10 IC2.12 J1.1 J2.1 J3.1 J4.1 J5.1 J6.1 J7.1 J8.1 Q3.1 Q4.1 R3.2 R5.2 R7.2 R14.2 R17.1 R18.1 R21.2 R23.2 R25.2 R32.2 R35.1 R36.1 X1.5 X1.6 X3.5 X3.6 X5.5 X5.6 X6.3 X6.4 X6.5 X6.6 X6.7 X6.8 X7.5 X7.6 | length 1510.5
  Top Layer w8: Q4.1 3148.05,1768.73 3170.46,1768.73 v1(3185.15,1754.04)
  Bottom Layer w8: R5.2 3070,2541.33 3081.75,2553.08 3101.06,2553.08 ; 3174.23,2552.39 3178.26,2552.39 3182.9,2547.75 3227.1,2547.75 3232.62,2542.23 ; v1(3330.15,2419.77) 3330.23,2419.77 3353,2397 3353,2370.15 C12.1
  Bottom Layer w10: X7.5 X7.6 ; X5.5 X5.6 ; X3.5 X3.6 ; X1.5 X1.6 ; X6.4 X6.6 X6.8 ; X6.3 X6.5 X6.7 ; IC2.12@3099.61,1986.06 3144.11,2022.72 IC2.12@3149.61,2047.24 ; IC2.3@3099.61,2298.65 3144.11,2262.98 IC2.3@3149.61,2238.45 ; J7.1 3165.35,1659.45 3239.25,1794.21 R23.2 ; IC2.10@3249.61,2047.24 3255.11,2022.72 IC2.10@3299.61,1986.06 ; IC2.5@3249.61,2238.45 3255.11,2262.98 3299.61,2298.65 IC2.5@3299.61,2299.64
  other v1: 3350.45,1683.8 3099.43,1730.35 3366.61,1777.45 3024.51,1895.89 3042.98,1955.81 2950.38,1969.27 2818.51,1972.14 2950,2050 3410,2110 3034.74,2119.1 3170,2120 3620,2390 3170,2610 3630,2790 3100,2850 3290,2850 3570,2950 3590,3210 3180,3630 3070,3870 3630,3980 3480,4180 3130,4250
CV_BACK1: R9.1 X2.1 X2.2 | length 1508.5
  Top Layer w10: X2.1 2757.6,3470.18 3096.24,3417.41 cw(c3090.42,3380.05) 3107.17,3413.96 3124.33,3396.79 cw(c3090.42,3380.05) 3125.75,3393.53 3242.57,3087.43 cw(c3190.42,3067.53) 3243.31,3085.38 cw(c3226.24,3079.66) 3244.24,3079.73 3244.24,3055.31 3242.87,2702.98 ccw(c3287.4,2702.76) 3242.87,2702.76 3242.87,2690.94 ccw(c3287.4,2690.94) 3243.04,2687.1 v1(3259.94,2492)
  Bottom Layer w10: X2.2 X2.1 ; R9.1 3209.65,2480.75 v1(3259.94,2492)
CV_BACK2: R27.1 X4.1 X4.2 | length 1772.4
  Top Layer w10: X4.1 2742.81,3120.75 2769.78,3078.16 cw(c2727.17,3051.18) 2774.95,3067.3 2865.58,2798.63 cw(c2840,2790) 2866.97,2791.32 2872.56,2676.87 ccw(c2890.54,2677.75) 2872.83,2674.53 2936.61,2323.58 cw(c2921.85,2320.9) 2936.85,2320.9 2936.85,2276.41 cw(c2921.85,2276.41) 2936.36,2272.6 2864.36,1998.1 2864.36,1974.01 ccw(c2899.61,1986.06) 2866.17,1969.65 2883.2,1952.62 ccw(c2899.61,1986.06) 2887.57,1950.81 3029.81,1922.37 cw(c3024.51,1895.89) 3035.81,1920.41 3187.48,1850.5 cw(c3176.18,1825.98) 3199.05,1840.33 v1(3211.03,1821.23)
  Bottom Layer w10: X4.2 X4.1 ; v1(3211.03,1821.23) 3210.93,1821.33 3208.18,1821.33 3239.25,1850.35 R27.1
CV_T1: J2.3 X3.1 X3.2 | length 700.6
  Top Layer w10: J2.3 2606.3,4797.24 2576.85,4568.45 ccw(c2591.73,4566.54) 2576.73,4566.54 2576.73,4348.82 ccw(c2627.17,4348.82) 2579.79,4331.52 2611.52,4244.61 X3.1
  Bottom Layer w10: X3.1 2657.6,4214.17 X3.2
CV_T2: J6.3 X7.1 X7.2 | length 700.2
  Top Layer w8: J6.3 2606.3,2690.94 2577.84,2461.96 ccw(c2591.73,2460.24) 2577.73,2460.24 2577.73,2242.52 ccw(c2627.17,2242.52) 2580.54,2226.1 2611.11,2139.31 X7.1
  Bottom Layer w10: X7.1 2657.6,2107.87 X7.2
CV_W1: R8.1 X3.3 X3.4 | length 2139.8
  Top Layer w10: X3.4 3075.86,3785.46 3094.52,3766.8 cw(c3055.12,3746.06) 3097.15,3760.77 3226.11,3392.55 cw(c3190.42,3380.05) 3226.44,3391.57 3326.44,3079.05 cw(c3290.42,3067.53) 3328.23,3068 3335.38,2491.52 cw(c3308.38,2491.19) 3319.13,2466.42 3269.25,2444.77 ccw(c3280,2420) 3253.05,2421.59 v1(3250,2370)
  Bottom Layer w10: X3.3 X3.4 ; R8.1 3209.65,2370 v1(3250,2370)
CV_W2: R26.1 X7.3 X7.4 | length 619.1
  Bottom Layer w10: X7.3 X7.4 2887.55,1851.07 ccw(c2906.43,1870.38) 2906.43,1843.38 2919.31,1843.38 cw(c2919.31,1816.38) 2922.89,1843.14 3112.27,1817.82 ccw(c3113.59,1827.74) 3119.22,1819.47 3120,1820 3120.71,1820.71 ccw(c3113.59,1827.74) 3122.11,1822.49 3139.25,1850.35 R26.1 ; v1(3118.16,1825.84) 3120.84,1823.16 v1@3122.52,1823.16
ENV1: J1.3 R6.1 | length 2598.7
  Top Layer w10: v1(3510,2520) 3544.2,3054.24 ccw(c3526.24,3055.39) 3544.23,3054.84 3553.9,3370.25 3554.61,3392.18 3569.69,3747.95 3614.17,4797.24 J1.3
  Bottom Layer w10: R6.1 3209.65,2520 v1(3510,2520)
ENV2: J5.3 R24.1 | length 1308.1
  Top Layer w10: v1(3176.18,1825.98) 3188.16,1806.88 ccw(c3211.03,1821.23) 3203.09,1795.42 3402.06,1734.19 ccw(c3410,1760) 3436.84,1757.04 3462.59,1990.14 cw(c3499.61,1986.06) 3464.05,1997.14 3552.04,2281.29 ccw(c3534.85,2286.61) 3552.12,2281.53 3575.9,2362.38 ccw(c3550,2370) 3576.82,2366.91 3614.17,2690.94 J5.3
  Bottom Layer w10: v1(3176.18,1825.98) 3175.71,1825.98 3171.24,1830.44 3189.25,1850.35 R24.1
GAIN_T1: R1.2 X1.1 X1.2 | length 192.9
  Bottom Layer w10: X1.1 2657.6,4548.82 X1.2 2807.28,4548.82 R1.2
GAIN_T2: R19.2 X5.1 X5.2 | length 193.1
  Bottom Layer w10: X5.1 2809.25,2442.52 R19.2
GAIN_W1: R2.1 X1.3 X1.4 | length 2416.1
  Top Layer w10: X1.4 3201.82,3771.62 cw(c3165.35,3746.06) 3209.58,3751.26 3254.61,3367.91 3343.67,3084.25 cw(c3290.42,3067.53) 3346.23,3068.22 3353.38,2491.75 cw(c3308.38,2491.19) 3332.43,2453.16 v1(3280,2420)
  Bottom Layer w10: X1.3 X1.4 ; R2.1 3209.65,2420 v1(3280,2420)
GAIN_W2: R20.1 X5.3 X5.4 | length 1010.2
  Top Layer w10: v1(3007.19,2187.23) 3007.27,2187.16 3009.76,2187.16 3007.75,2119.91 ccw(c3034.74,2119.1) 3009.71,2108.98 3065.08,1972.09 ccw(c3099.61,1986.06) 3066.17,1969.65 3083.2,1952.62 ccw(c3099.61,1986.06) 3087.57,1950.81 v1(3350,1890)
  Bottom Layer w10: X5.3 X5.4 X5.4 cw(c2727.11,2332.52) 2732.89,2340.68 2859.45,2251.11 ccw(c2877.36,2276.41) 2865.18,2247.9 v1(3007.19,2187.23) ; R20.1 3310.75,1875.79 v1(3350,1890)
IN1: C3.1 J4.3 | length 134.9
  Bottom Layer w10: J4.3 2606.3,3746.06 2607.36,3839.06 C3.1
IN2: C10.1 J8.3 | length 134.2
  Bottom Layer w10: J8.3 2606.3,1659.45 2619.57,1750.79 C10.1
IN_BACK1: C2.1 X2.3 X2.4 | length 350
  Bottom Layer w10: C2.1 2609.57,3580.79 2580.08,3503.88 ccw(c2627.17,3485.83) 2583.18,3461.15 2622.59,3390.93 ccw(c2631.31,3395.83) 2624.19,3388.8 X2.4 X2.3
IN_BACK2: C9.1 X4.3 X4.4 | length 347.2
  Bottom Layer w10: C9.1 2609.57,2859.21 2580.32,2932.49 cw(c2627.17,2951.18) 2583.18,2975.86 2622.59,3046.07 cw(c2631.31,3041.18) 2624.22,3048.23 X4.4 X4.3
NetC1_1: C1.1 D1.1 IC2.1 Q1.1 | length 491
  Bottom Layer w10: Q1.1 2894,2474.33 D1.1 2899.61,2446.93 IC2.1@2899.61,2298.65 ; IC2.1@2899.61,2299.64 2916.85,2281.41 2990.36,2262.57 ccw(c2999.61,2298.65) 2999.61,2261.41 3044.11,2261.41 IC2.1@3049.61,2238.45
NetC1_2: C1.2 D1.2 IC2.2 R2.2 R4.1 R6.2 R8.2 R9.2 | length 655.1
  Bottom Layer w10: IC2.2@2999.61,2299.64 IC2.2@2999.61,2298.65 ; R4.1 3020,2474.33 D1.2 ; IC2.2@3099.61,2238.45 3094.11,2262.98 3088.92,2262.98 cw(c3099.61,2298.65) 3082.41,2265.62 3068.71,2277.72 ccw(c3060.11,2267.98) 3064.17,2280.32 3007.06,2299.14 ccw(c3003.93,2289.64) IC2.2@2999.61,2298.65 ; R8.2 R9.2 ; R6.2 R9.2 ; IC2.2@2999.61,2298.65 2995.67,2302.59 cw(c3002.8,2309.61) 2992.85,2308.56 2987.13,2363.27 C1.2 2987.13,2400.51 3005,2446.93 D1.2 ; D1.2 3030.43,2460.71 ccw(c3029.53,2470.67) 3030.51,2460.72 3117.28,2469.32 R9.2
NetC2_2: C2.2 R12.1 | length 71.2
  Bottom Layer w10: C2.2 2750,3619.21 R12.1
NetC3_2: C3.2 R16.1 | length 93.7
  Bottom Layer w10: C3.2 R16.1
NetC8_1: C8.1 D2.1 IC2.8 Q2.1 | length 485.5
  Bottom Layer w10: IC2.8@3349.61,2047.24 3355.11,2023.3 3399.61,2023.3 cw(c3399.61,1986.06) 3412.49,2021 3493.07,1991.3 cw(c3489.61,1981.91) 3496.68,1988.98 3499.61,1986.06 3499.61,1928.62 C8.1 D2.1 3486,1816.3 Q2.1
NetC8_2: C8.2 D2.2 IC2.9 R20.2 R22.1 R24.2 R26.2 R27.2 | length 645.3
  Bottom Layer w10: R26.2 R20.2 3310.75,1942.72 3381.86,1972.89 ccw(c3377.95,1982.09) 3385,1975 3393.18,1983.18 cw(c3400.22,1976.07) IC2.9@3399.61,1986.06 ; IC2.9@3299.61,2047.24 3305.11,2022.72 3306.17,2022.72 cw(c3299.61,1986.06) 3320.14,2017.13 3330.5,2007.97 ccw(c3339.11,2017.72) 3335.38,2005.26 IC2.9@3399.61,1986.06 ; R22.1 3310.75,1816.3 3353.27,1816.3 D2.2 3378.7,1843.7 3396.57,1891.38 C8.2 3403.11,1928.62 3403.11,1976.5 ccw(c3393.11,1976.5) 3403.11,1976.55 3403.11,1977.56 ccw(c3393.11,1977.56) 3401.61,1982.84 IC2.9@3399.61,1986.06 ; IC2.9@3396.06,1986.06 IC2.9@3399.61,1986.06
NetC9_2: C9.2 R30.1 | length 76.9
  Bottom Layer w10: C9.2 R30.1
NetC10_2: C10.2 R34.1 | length 96.9
  Bottom Layer w10: C10.2 R34.1
NetIC1_1: IC1.1 R10.1 | length 273.9
  Bottom Layer w10: R10.1 2908.24,3419.25 2908.24,3397.86 2900,3390 2908.24,3362.23 2980.96,3343.44 ccw(c2990.42,3380.05) 2989.14,3342.26 3059.82,3339.85 IC1.1@3074.06,3300.2
NetIC1_3: IC1.3 R18.2 | length 189
  Bottom Layer w10: R18.2 3090.42,3427.28 3090.42,3380.05 3100,3366.26 3130.47,3357.33 cw(c3126.82,3344.85) 3133.62,3355.93 3159.82,3339.85 3168.06,3306.2 IC1.3@3174.06,3300.2
NetIC1_4: IC1.4 R12.2 R16.2 R17.2 | length 1043
  Top Layer w10: v1(2950,3860) 3014.48,3716.05 ccw(c3055.12,3734.25) 3015.68,3713.59 3190.42,3380.05 IC1.4@3198.66,3364.92
  Bottom Layer w10: R12.2 2695.79,3680.75 2888.86,3847.52 R16.2 2914.29,3860 v1(2950,3860) ; R17.2 3190.42,3427.28 3190.42,3380.05 3200,3366.26 3199.54,3366.92 3209.82,3339.85 IC1.4@3224.06,3300.2
NetIC1_5: IC1.5 IC2.6 R13.1 | length 1794.8
  Top Layer w10: v1(3450,3240) 3524.55,3083.82 cw(c3490.42,3067.53) 3526.24,3079.66 3526.24,3055.39 3483.09,2522.18 ccw(c3510,2520) 3483.82,2513.41 3534.85,2310.69 3534.85,2286.61 cw(c3499.61,2298.65) 3533.02,2282.2 v1(3471.75,2220.19)
  Bottom Layer w10: IC1.5@3265.82,3315.32 3265.82,3290.31 ccw(c3275.82,3290.35) 3273.26,3280.68 3301.5,3273.23 ccw(c3304.82,3285.8) 3301.98,3273.11 v1(3450,3240) ; IC1.5@3274.06,3300.2 3290.42,3380.05 IC1.5@3298.66,3364.92 ; IC2.6@3399.61,2299.64 IC2.6@3399.61,2298.65 ; R13.1 3407.28,2359.25 3401.04,2305.46 cw(c3391.11,2306.64) 3400.88,2304.48 3399.72,2299.26 ccw(c3409.48,2297.1) IC2.6@3399.61,2298.65 ; v1(3471.75,2220.19) 3362.9,2196.23 cw(c3360.11,2208.92) 3360.11,2195.92 3339.11,2195.92 cw(c3339.11,2208.92) 3332.49,2197.73 3305.11,2213.92 3299.61,2238.45 3305.11,2262.98 3310.3,2262.98 ccw(c3299.61,2298.65) 3316.1,2265.26 3330.6,2277.81 cw(c3339.11,2267.98) 3335.56,2280.48 IC2.6@3399.61,2298.65
NetIC1_12: IC1.12 IC2.13 R31.1 | length 1518.1
  Top Layer w8: IC2.13@2999.61,1986.06 2981.3,2184.85 cw(c3007.19,2187.23) 2984.67,2200.23 3031,2280.54 ccw(c2999.61,2298.65) 3033.85,2286.78 3033.85,2310.53 v1(3020,2380) ; v1(3080,2380) 3092.84,2479.63 3110,2496.79 3110,2563.71 3119.65,2573.36 3119.65,2582.54 3136.35,2599.23 3136.35,2620.77 3116.23,2640.89 3116.23,2660.49 cw(c3124.23,2660.49) 3116.29,2661.51 3122.77,2711.78 cw(c3165.35,2702.76) 3123.69,2715.35 v1(3165.16,2852.54)
  Bottom Layer w8: v1(3020,2380) v1(3080,2380) ; v1(3165.16,2852.54) 3221.71,2884.94 ccw(c3215.75,2895.35) 3226.93,2891.01 3289.88,3053.05 ccw(c3282.42,3055.94) 3290.42,3055.9 3290.42,3067.53 IC1.12@3290.42,3063.1
  Bottom Layer w10: R31.1 2986.18,1920.75 2997.37,1979.75 cw(c3007.19,1977.89) 2997.84,1981.42 2999.61,1986.06 3063.83,2005.26 ccw(c3060.11,2017.72) 3068.71,2007.97 3079.07,2017.13 cw(c3099.61,1986.06) 3093.04,2022.72 3094.11,2022.72 IC2.13@3099.61,2047.24 ; IC1.12@3274.06,3115.16 3276.53,3076.1 ccw(c3286.51,3076.73) 3290.42,3067.53 IC1.12@3285.99,3063.1
NetIC1_13: IC1.13 R30.2 R34.2 R35.2 | length 1730.5
  Top Layer w8: v1(2840,2790) 2865.32,2325.39 cw(c2839.36,2323.97) 2865.22,2321.29 2863.36,2303.36 2847.39,1998.99 ccw(c2864.36,1998.1) 2847.36,1998.1 2847.36,1974.01 ccw(c2864.36,1974.01) 2848.15,1968.91 2881.63,1862.57 ccw(c2906.43,1870.38) 2886.91,1853.21 v1(2919.31,1816.38)
  Top Layer w10: v1(2940,2840) 2946.54,2875.05 ccw(c2920,2880) 2946.52,2885.05 2940.41,2917.21 cw(c2966.93,2922.26) 2954.58,2946.27 IC1.13@3190.42,3067.53
  Bottom Layer w8: v1(2840,2790) 2873.21,2828.25 R30.2
  Bottom Layer w10: R30.2 2899.65,2840 v1(2940,2840) ; R34.2 2919.31,1780.75 v1(2919.31,1816.38) ; IC1.13@3198.66,3052.4 3190.42,3067.53 3190.42,2992.72 R35.2 ; IC1.13@3199.65,3051.42 3196.33,3057.21 ccw(c3200.42,3066.34) 3207.47,3059.25 3208.83,3060.6 ccw(c3201.74,3067.66) 3211.74,3067.66 3211.74,3105.76 IC1.13@3224.06,3115.16
NetIC1_14: IC1.14 R36.2 | length 212.5
  Bottom Layer w10: R36.2 3090.42,2992.72 3090.42,3067.53 3098.66,3050.43 3098.58,3050.6 ccw(c3100.42,3060.43) 3100.42,3050.43 3104.94,3050.43 ccw(c3104.94,3060.43) 3112.33,3053.69 3159.82,3105.76 3168.06,3109.16 IC1.14@3174.06,3115.16
NetIC1_16: IC1.16 R28.1 | length 293.4
  Bottom Layer w10: R28.1 2898.66,2980.75 2898.66,3052.4 2890.42,3067.53 2976.12,3102.54 cw(c2990.42,3067.53) 2990.2,3105.34 3059.82,3105.76 IC1.16@3074.06,3115.16
NetIC2_7: IC2.7 R11.1 R13.2 R15.1 | length 1557.8
  Top Layer w10: v1(3550,2370) 3569.72,2705.37 cw(c3614.17,2702.76) 3570.23,2709.95 3627.74,3061.42 ccw(c3590.42,3067.53) 3628.24,3067.53 3628.24,3380.05 ccw(c3590.42,3380.05) 3627.91,3385.02 v1(3610,3520)
  Bottom Layer w10: IC2.7@3349.61,2238.45 3355.11,2261.41 3399.61,2261.41 ccw(c3399.61,2298.65) 3412.86,2263.85 3493.17,2294.43 ccw(c3489.61,2303.78) 3496.53,2296.56 3496.67,2296.7 cw(c3503.59,2289.48) IC2.7@3499.61,2298.65 ; R13.2 3486.93,2380.75 R11.1 ; IC2.7@3499.11,2299.15 IC2.7@3499.61,2298.65 ; v1(3550,2370) 3500,2370 3495.98,2359.25 3499.58,2304.44 cw(c3489.61,2303.78) 3499.61,2303.82 IC2.7@3499.61,2298.65 ; v1(3610,3520) 3610,3560.35 R15.1
NetIC2_14: IC2.14 R29.1 R31.2 R33.1 | length 2130.2
  Top Layer w10: IC2.14@2899.61,1986.06 2954.26,2270.18 ccw(c2921.85,2276.41) 2954.41,2271.01 2996.64,2525.58 ccw(c2970,2530) 2996.83,2533 2977.32,2707.7 ccw(c2933.07,2702.76) 2972.47,2723.5 2972.23,2723.95 ; v1(2906.43,1870.38) 3109.35,1800.32 ccw(c3118.16,1825.84) 3121.12,1799 3130.23,1800.01 cw(c3131.65,1787.09) 3131.65,1800.09 3163.15,1800.09 cw(c3163.15,1787.09) 3172.34,1796.28 3179.13,1789.49 ccw(c3211.03,1821.23) 3197.8,1778.22 3396.76,1716.99 ccw(c3410,1760) 3440.16,1726.6 v1(3610,1880) ; v1(2920,2880) 2913.46,2844.95 ccw(c2940,2840) 2916.27,2827.13 2972.21,2723.99
  Bottom Layer w10: R29.1 2889.65,2909.25 v1(2920,2880) ; v1(2906.43,1870.38) 2906.43,1899.25 R31.2 2899.61,1920.75 2899.61,1986.06 2902.56,1989 cw(c2909.61,1981.91) 2906.15,1991.3 2986.72,2021 cw(c2999.61,1986.06) 2999.61,2023.3 3044.11,2023.3 IC2.14@3049.61,2047.24 ; R33.1 v1(3610,1880)
NetJ1_2: J1.2 R3.1 | length 93.5
  Bottom Layer w10: J1.2 3287.4,4720.75 R3.1
NetJ2_2: J2.2 R7.1 | length 93.6
  Bottom Layer w10: R7.1 2933.07,4720.75 J2.2
NetJ4_2: J4.2 R14.1 | length 98.4
  Bottom Layer w10: R14.1 J4.2
NetJ5_2: J5.2 R21.1 | length 93.2
  Bottom Layer w10: R21.1 3287.4,2779.25 J5.2
NetJ6_2: J6.2 R25.1 | length 93.6
  Bottom Layer w10: R25.1 2933.07,2779.25 J6.2
NetJ8_2: J8.2 R32.1 | length 128.1
  Bottom Layer w10: J8.2 2933.07,1659.45 2967.28,1759.25 R32.1
NetJ9_1: J9.1 Q3.3 R4.2 | length 298.2
  Top Layer w8: Q3.3 3180.99,2560 3193.67,2572.69 v1(3193.67,2573.75)
  Bottom Layer w8: R4.2 3020,2604.96 3031.75,2593.21 3033.72,2593.21 3042.25,2584.68 3042.25,2584.24 3054.35,2572.14 3192.07,2572.14 v1(3193.67,2573.75) ; v1@3193.67,2572.64 3196.32,2570 J9.1
NetJ9_2: J9.2 Q1.2 Q3.2 R5.1 | length 460.8
  Top Layer w8: Q3.2 3070.63,2550.35 3083.8,2563.51 3087.18,2563.51 3100.35,2576.68 3100.35,2590.35 3110,2600 3110,2609.65 v1(3110.35,2610)
  Bottom Layer w8: Q1.2 2966,2621.31 2973,2628.31 2984.31,2628.31 2996,2640 3040,2640 3058.25,2621.75 3058.25,2620.65 3068.9,2610 v1(3110.35,2610) 3133.23,2610 3163.23,2640 3222.56,2640 3244.06,2618.49 3244.06,2603.4 3249.91,2597.56 J9.2
NetJ10_1: J10.1 Q4.3 R22.2 | length 425.6
  Top Layer w8: Q4.3 3121.75,1702.98 3165.35,1702.98 cw(c3165.35,1659.45) 3195.98,1690.38 v1(3230,1656.69)
  Bottom Layer w8: R22.2 3288.25,1726.28 3254.73,1688.21 ccw(c3287.4,1659.45) 3253.1,1686.25 v1(3230,1656.69) 3230,1630 3260,1600 3310,1600 3322.44,1612.44 J10.1
NetJ10_2: J10.2 Q2.2 Q4.2 R23.1 | length 515.3
  Top Layer w8: Q4.2 3084.35,1756.35 3099.43,1756.35 cw(c3099.43,1730.35) 3118.17,1748.36 3123,1743.34 ccw(c3131.65,1751.65) 3127.2,1740.51 3230.28,1699.29 3230.28,1700.65 v1(3231.19,1701.56)
  Bottom Layer w8: v1(3231.19,1701.56) 3238.25,1726.28 R23.1 3261.75,1753.72 3276.26,1766.67 cw(c3284.25,1757.72) 3284.25,1769.72 3315.75,1769.72 cw(c3315.75,1757.72) 3323.11,1767.19 3407,1702 Q2.2 3414,1668.69 3407,1661.69 3395.69,1661.69 3379.84,1645.84 3365.84,1645.84 J10.2
NetQ1_3: Q1.3 R10.2 | length 975.1
  Top Layer w10: v1(2852.61,3310.76) 2926.45,3079.01 cw(c2890.42,3067.53) 2927.54,3060.31 2893.5,2885.15 ccw(c2920,2880) 2893,2880.4 2890.54,2715.95 2890.54,2677.75 ccw(c2933.07,2690.94) 2893.96,2669.65 v1(2970,2530)
  Bottom Layer w10: v1(2852.61,3310.76) 2852.61,3419.25 R10.2 ; Q1.3 v1(2970,2530)
NetQ2_3: Q2.3 R28.2 | length 1435.4
  Top Layer w10: v1(2966.93,2922.26) 3062.79,2293.04 ccw(c3099.61,2298.65) 3064.13,2287.31 3164.13,1974.71 ccw(c3199.61,1986.06) 3192.2,1949.55 3355.37,1916.46 cw(c3350,1890) 3376.21,1896.49 v1(3410,1760)
  Bottom Layer w10: v1(2966.93,2922.26) R28.2 ; v1(3410,1760) Q2.3
OUT1: J3.3 R15.2 | length 100.8
  Bottom Layer w10: R15.2 3614.17,3652.72 J3.3
OUT2: J7.3 R33.2 | length 97.1
  Bottom Layer w10: R33.2 3614.17,1737.28 J7.3
OUT_BACK1: R11.2 X2.5 X2.6 | length 1511.3
  Top Layer w10: X2.5 2841.87,3335.53 cw(c2852.61,3310.76) 2867.81,3333.07 3211.71,3098.78 cw(c3190.42,3067.53) 3220,3091.09 3222.29,3087.89 cw(c3190.42,3067.53) 3226.24,3079.66 3226.24,3055.39 3224.87,2703 ccw(c3287.4,2702.76) 3224.87,2702.76 3224.87,2690.85 ccw(c3287.4,2690.94) 3224.93,2688.4 3232.97,2490.9 ccw(c3259.94,2492) 3274.61,2469.33 v1(3308.38,2491.19)
  Bottom Layer w10: X2.6 X2.5 ; v1(3308.38,2491.19) 3407.28,2430.75 R11.2
OUT_BACK2: R29.2 X4.5 X4.6 | length 189.7
  Bottom Layer w10: X4.6 X4.5 2797.28,2930.75 R29.2
pads on no net: IC1.2 IC1.7 IC1.8 IC1.9 IC1.10 IC1.15 J3.2 J7.2 X6.
copper on no net: | length 11.9
  Top Layer w8: 3040,1960 3042.98,1957.02 3042.98,1955.81 ; 3185.15,1754.04 3185.96,1754.04 3190,1750

## Polygon pours and split planes (outlines as drawn)
CV_B1 on Bottom Layer "NONET_L02_P-001" (solid, remove dead copper, pour order 0): 2560,5510 3660,5510 3660,1580 2560,1580
CV_B1 on Top Layer "NONET_L02_P-001" (solid, remove dead copper, pour order 1): 2560,5510 3660,5510 3660,1580 2560,1580

## Keep-outs
Top Layer:
  circle w10: c2800.2,3740.16 r21.3
  circle w10: c2800.2,3740.16 r44.21
  circle w10: c2800.2,2696.85 r21.3
  circle w10: c2800.2,2696.85 r44.21
  circle w10: c2800.2,1653.54 r21.3
  circle w10: c2800.2,1653.54 r44.21
  circle w10: c3420.28,1653.54 r21.3
  circle w10: c3420.28,1653.54 r44.21
  circle w10: c3420.28,2696.85 r21.3
  circle w10: c3420.28,2696.85 r44.21
  circle w10: c3420.28,3740.16 r21.3
  circle w10: c3420.28,3740.16 r44.21
  circle w10: c3420.28,4803.15 r21.3
  circle w10: c3420.28,4803.15 r44.21
  circle w10: c2800.2,4803.15 r44.21
  circle w10: c2800.2,4803.15 r21.3

## Silkscreen, mask and mechanical layers (free items; w line width, h text height)
Board Shape:
  the board outline again, w1